# Altium PCB EXPLORER_V3.4.PcbDoc (part 4 of 4)
Units mm, origin at the board's own origin, x right, y up, seen from the top; angles counter-clockwise.
Board outline 160 x 121.01 mm, 2 copper layers (Top Layer, Bottom Layer); 254 components, 245 nets, 1181 pads, 772 vias.
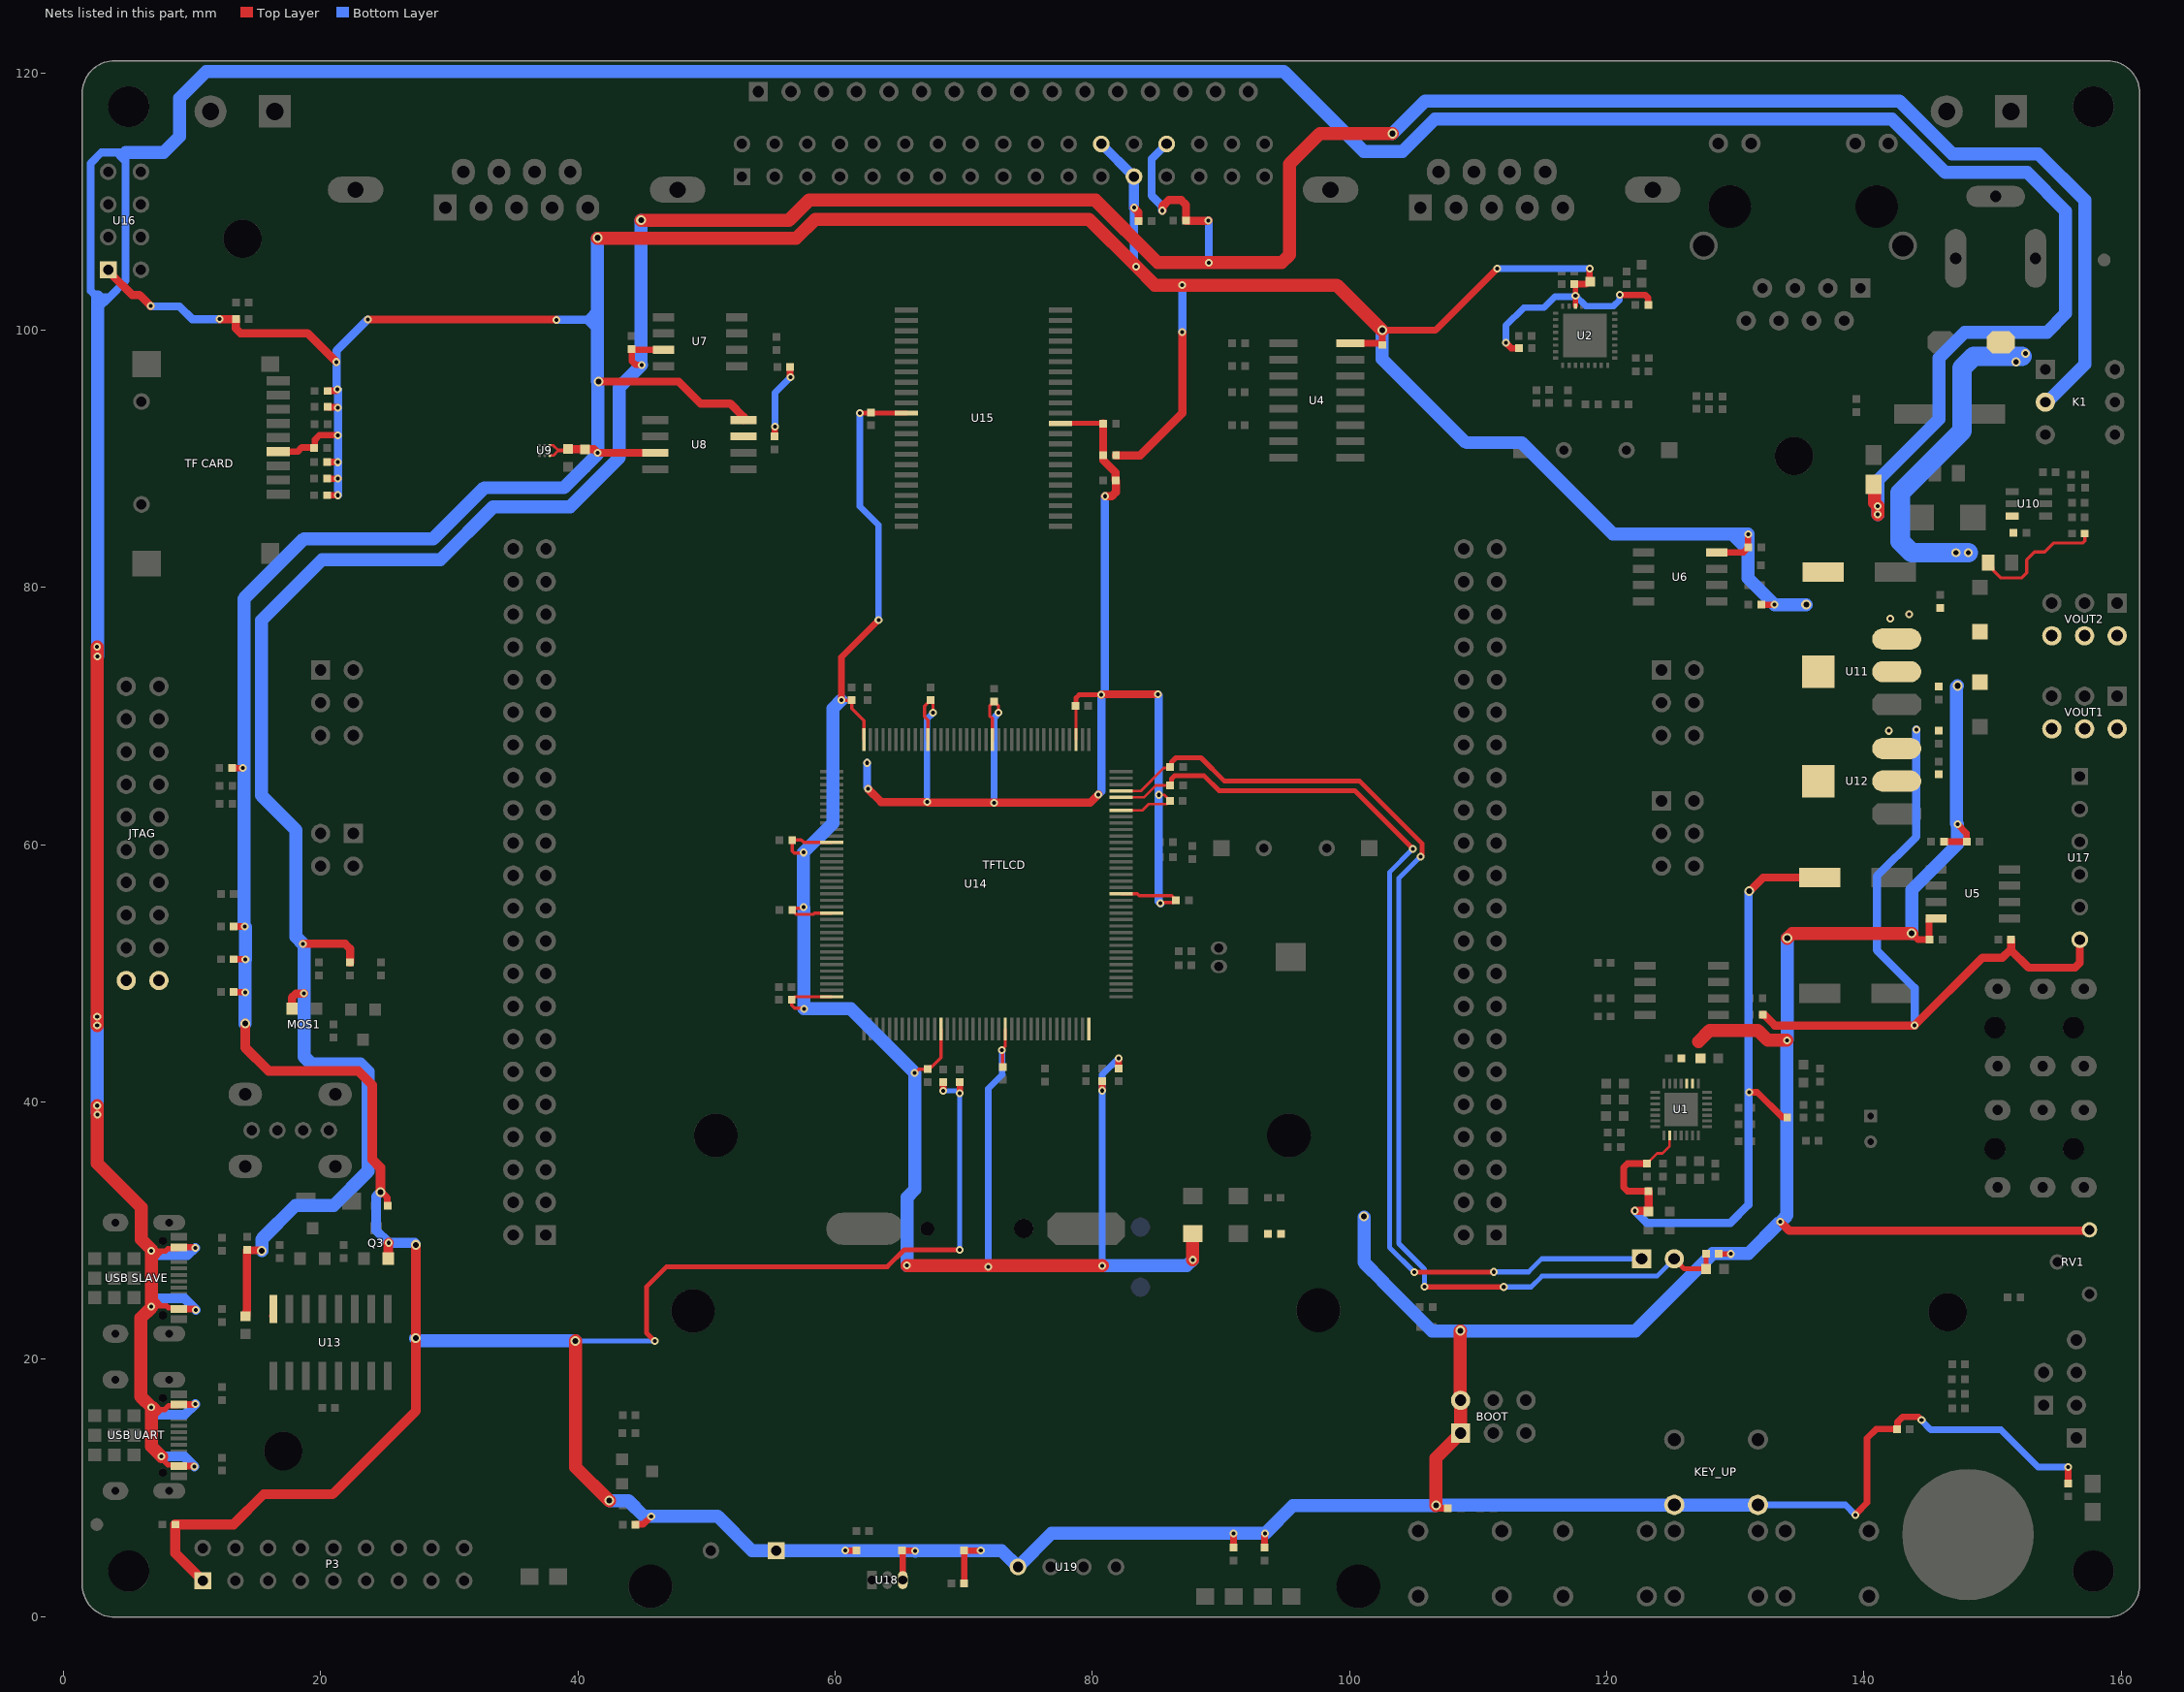
[diagram p4: the nets of this part, all layers, seen from the top]

## Via types
v1: diameter 0.61, hole 0.305, Top Layer to Bottom Layer, tented both sides, 732 vias
v2: diameter 0.762, hole 0.457, Top Layer to Bottom Layer, tented both sides, 23 vias
v3: diameter 0.6, hole 0.3, Top Layer to Bottom Layer, 12 vias
v4: diameter 0.7, hole 0.4, Top Layer to Bottom Layer, tented both sides, 5 vias

## Nets (pads, with @x,y where several pads share a name; then routed paths per layer and width w, separated by ;. In a path a pad name is that pad's centre, name@x,y a point inside that pad or via, vN(x,y) a via of type N, cw(c..) or ccw(c..) an arc to the next point about the centre after c; other vN are vias at no path point) (continued)
VCC3.3: "TF CARD.4" BEEP.1 BOOT.1 BOOT.2 C1.2 C2.2 C9.2 C36.1 C37.1 C42.2 C43.2 C44.2 C46.1 C47.2 C48.2 C53.2 C57.1 C90.1 C92.2 C94.1 C95.1 D3.2 JTAG.1 JTAG.2 KEY_UP.1 L1.1 P3.1 Q3.1 R4.2 R10.2 R19.2 R20.2 R21.1 R22.1 R23.1 R25.2 R26.1 R27.2 R29.1 R31.1 R35.2 R47.1 R51.2 R53.2 R56.1 R57.1 R59.2 R60.2 R61.2 R62.2 R67.2 R68.2 R69.2 R71.1 R75.2 R76.2 R77.2 RV1.3 TFTLCD.24 TFTLCD.25 U1.2 U1.3 U2.14 U4.16 U5.8 U6.8 U8.3 U8.7 U8.8 U9.A1 U9.C1 U11.2 U11.4 U16.2 U18.3 U19.1 VOUT1.2 VOUT1.4 VOUT1.6 | length 803.9
  Top Layer w0.203: U9.A1@37.814,90.253 38.081,90.253 38.481,90.653 38.081,91.053 U9.C1@37.814,91.053
  Top Layer w0.305: 38.481,90.653 39.105,90.653 C47.2@39.219,90.767
  Top Layer w0.381: v1(45.974,21.412) 45.326,22.06 45.326,25.632 46.898,27.203 64.059,27.203 65.38,28.524 v1(69.698,28.524) ; C9.2@117.475,103.581 117.566,103.49 v1(117.566,102.692) U2.14@117.566,101.882
  Top Layer w0.406: R53.2@128.711,28.194 v1(129.642,28.194)
  Top Layer w0.508: R62.2@13.116,65.964 v1(13.945,65.964) ; R59.2@13.243,48.565 13.268,48.539 v1(14.122,48.539) ; R60.2@13.243,51.105 14.122,51.105 v1(14.148,51.079) ; R61.2@13.243,53.645 v1(14.097,53.645) ; 16.688,90.558 18.194,90.558 18.517,90.881 19.452,90.881 C44.2@19.452,90.902 ; C44.2@19.498,90.856 19.544,90.902 19.544,91.498 19.892,91.846 21.283,91.846 21.309,91.821 v1(21.336,91.821) ; R21.1@20.498,87.173 v1(21.336,87.173) ; R22.1@20.498,88.464 21.383,88.464 21.378,88.468 v1(21.336,88.468) ; R23.1@20.498,89.755 21.292,89.755 21.311,89.736 21.313,89.738 v1(21.336,89.738) ; R29.1@20.523,94.056 20.569,94.01 21.306,94.01 v1(21.336,93.98) ; R31.1@20.523,95.275 20.547,95.299 21.205,95.299 v1(21.308,95.402) ; v2(24.636,32.995) 24.685,32.946 24.801,32.946 25.177,32.57 25.177,31.947 R47.1@25.197,31.928 ; R76.2@44.485,7.137 44.531,7.183 45.08,7.183 v1(45.695,7.798) ; C46.1@55.296,91.745 55.296,92.481 v1(55.321,92.507) ; R35.2@56.499,97.13 56.499,96.358 v1(56.515,96.342) ; v1(60.782,5.131) R71.1@61.646,5.131 ; U18.3@65.259,2.845 65.259,5.074 C94.1@65.202,5.131 66.165,5.131 66.19,5.105 v1(66.218,5.105) ; v1(68.402,40.869) R19.2@68.402,41.545 ; v1(69.698,40.691) R20.2@69.698,41.545 ; R75.2@70.037,2.591 70.037,5.121 C95.1@70.028,5.131 v1(71.323,5.131) ; R67.2@90.983,5.369 v1(90.983,6.477) ; R68.2@93.396,5.369 93.396,6.426 v1(93.421,6.452) ; U4.16@100.06,98.984 102.413,98.984 C37.1@102.54,98.857 v2@102.54,99.974 ; v2(102.54,100) 106.68,100 v1(111.481,104.8) ; v2@106.718,8.623 106.909,8.433 R51.2@107.636,8.433 ; v1(112.166,99.035) 112.166,99.016 112.579,98.603 R10.2@113.173,98.603 ; C9.2@117.475,103.581 118.415,103.581 L1.1@118.669,103.835 ; v1(118.669,104.8) L1.1@118.669,103.835 ; L1.1@118.72,103.784 L1.1@118.669,103.835 ; v1(121.006,102.743) 122.987,102.743 123.225,102.505 R4.2@123.225,101.981 ; U6.8@128.56,82.728 130.623,82.728 C43.2@131.004,83.109 130.988,83.125 v1(130.988,84.15) ; R26.1@132.004,78.664 v1(133.045,78.664) ; v1(139.344,7.899) 139.344,7.927 139.395,7.978 139.395,8.018 140.233,8.856 140.233,13.868 140.945,14.58 R77.2@142.561,14.58 142.607,14.626 142.607,15.124 143.002,15.519 144.247,15.519 ; v2@143.713,53.111 144.196,52.629 C42.2@145.101,52.629 145.059,52.67 145.059,54.216 145.123,54.28 U5.8@145.608,54.28 ; R27.2@146.212,60.249 R25.2@147.996,60.249 147.975,60.27 147.975,60.889 v1(147.269,61.595) ; R69.2@155.88,10.347 v1(155.88,11.633)
  Top Layer w0.635: U16.2@3.48,104.699 3.762,104.416 3.762,104.315 5.334,102.743 5.906,102.743 v1(6.769,101.879) ; v1(12.131,100.863) C92.2@13.402,100.863 13.383,100.845 13.383,100.143 13.755,99.771 18.974,99.771 v1(21.209,97.536) ; v1(23.673,100.838) 38.303,100.838 v1(38.329,100.813) ; C47.2@39.219,90.767 39.245,90.742 C48.2@40.54,90.742 41.262,90.742 v1(41.529,90.475) 41.531,90.473 U8.3@46.025,90.473 ; v2(41.605,96.012) 47.828,96.012 49.53,94.31 51.841,94.31 52.883,93.269 U8.8@52.883,93.015 ; R57.1@81.839,90.272 83.718,90.272 86.989,93.542 v1(86.989,99.847) ; v1(83.236,109.525) 83.591,109.169 C90.1@83.591,108.483 ; v1(133.502,30.683) 134.188,29.997 157.458,29.997 RV1.3@157.531,30.07
  Top Layer w0.762: P3.1@10.829,2.788 8.687,4.93 C36.1@8.687,7.163 13.208,7.163 15.57,9.525 20.93,9.525 27.407,16.002 v2@27.407,28.88 ; v2(14.122,46.101) 14.122,44.247 15.951,42.418 22.911,42.418 24.003,41.326 24.003,35.535 24.636,34.901 v2(24.636,32.995) ; Q3.1@25.258,27.832 25.258,29.042 v1(25.273,29.058)
  Top Layer w1.016: v2(39.802,21.438) 39.827,21.412 39.827,11.608 v2@42.443,8.992 ; v2@41.529,107.163 41.554,107.137 56.972,107.137 58.471,108.636 79.731,108.636 v1(83.414,104.953) 84.857,103.51 v1(86.994,103.51) 99.004,103.51 102.514,100 v2(102.54,100) ; v2@106.718,8.623 v2(106.718,8.649) 106.718,12.332 108.636,14.249 BOOT.1@108.636,14.275 BOOT.2@108.636,16.815 108.61,16.84 108.61,22.2 v2@108.629,22.219 ; 127.127,44.704 127.991,45.568 131.75,45.568 132.512,44.806 v1(134.01,44.806) ; v2@134.036,52.73 134.417,53.111 v2@143.713,53.111
  Bottom Layer w0.381: v2@39.702,21.549 39.69,21.549 v2(39.802,21.438) ; v2@39.862,21.412 v1(45.974,21.412) ; v1(68.402,40.869) 69.458,40.869 69.636,40.691 v1(69.698,40.691) v1(69.698,28.524)
  Bottom Layer w0.508: v1(55.321,92.507) 55.321,95.148 v1(56.515,96.342) ; v1(111.481,104.8) v1(118.669,104.8) ; v1(112.166,99.035) 112.166,100.381 113.538,101.752 115.113,101.752 115.959,102.598 117.566,102.598 v1(117.566,102.692) 118.379,101.879 120.523,101.879 121.006,102.362 v1(121.006,102.743) ; KEY_UP.1@131.75,8.687 138.557,8.687 v1(139.344,7.899) ; v1(144.475,15.291) 144.475,15.24 145.186,14.529 150.647,14.529 153.543,11.633 v1(155.88,11.633)
  Bottom Layer w0.635: v1(6.769,101.879) 6.795,101.854 9.017,101.854 10.008,100.863 v1(12.131,100.863) ; v1(21.336,87.173) v1(21.336,88.468) v1(21.336,89.738) 21.336,91.796 21.311,91.821 v1(21.336,91.821) v1(21.336,93.98) 21.336,95.373 v1(21.308,95.402) 21.234,95.475 21.234,98.425 23.647,100.838 v1(23.673,100.838) ; v1(38.329,100.813) 40.691,100.813 ; 41.504,100.736 41.427,100.813 40.691,100.813 ; 41.529,99.974 40.691,100.813 ; 41.529,101.651 40.691,100.813 ; v1(83.236,109.525) 83.236,105.131 v1(83.414,104.953) ; v1(86.989,99.847) 86.989,103.505 v1(86.994,103.51)
  Bottom Layer w0.762: v2(24.636,32.995) 24.308,32.666 24.308,30.023 v1(25.273,29.058) 27.305,29.058 27.407,28.956 v2(27.407,28.905) v2@27.407,28.88 ; TFTLCD.24@80.694,114.484 TFTLCD.25@83.234,111.944 83.234,109.527 v1(83.236,109.525)
  Bottom Layer w1.016: v2(14.122,46.101) v1(14.122,48.539) 14.122,51.054 v1(14.148,51.079) 14.148,53.594 v1(14.097,53.645) 14.021,53.721 14.021,65.888 v1(13.945,65.964) 14.021,66.04 14.021,79.121 18.694,83.795 28.753,83.795 32.715,87.757 38.913,87.757 41.529,90.373 v1(41.529,90.475) 41.554,90.5 v2@41.554,95.936 ; v2(27.381,21.641) 27.584,21.438 v2(39.802,21.438) ; v2@41.529,96.012 41.529,99.974 41.529,100.711 41.504,100.736 41.529,100.762 41.529,101.651 v2@41.529,107.163 ; v2@42.443,8.992 43.942,8.992 45.136,7.798 v1(45.695,7.798) 50.876,7.798 53.543,5.131 BEEP.1@55.423,5.131 v1(60.782,5.131) 66.192,5.131 v1(66.218,5.105) 66.243,5.131 v1(71.323,5.131) 72.949,5.131 U19.1@74.219,3.861 76.835,6.477 v1(90.983,6.477) 93.396,6.477 v1(93.421,6.452) 95.606,8.636 106.705,8.636 v2@106.718,8.623 ; v2@101.117,31.039 101.117,27.534 102.616,26.035 102.616,26 106.416,22.2 108.585,22.2 108.604,22.219 108.629,22.219 108.649,22.2 122.225,22.2 128.245,28.219 131.013,28.219 v1@133.452,30.658 ; v2(102.54,100) 102.54,97.765 108.941,91.364 ; v2@106.655,8.687 KEY_UP.1@125.25,8.687 KEY_UP.1@131.75,8.687 ; 109.129,91.262 113.386,91.262 120.472,84.176 129.743,84.176 ; v1(133.502,30.683) 134.01,31.191 v1(134.01,44.806) 134.036,44.831 v2@134.036,52.73 ; v2(135.509,78.664) v1(133.045,78.664) 130.988,80.721 130.988,82.931 ; v2@143.713,53.111 v2(143.713,53.137) 143.713,56.49 147.269,60.046 v1(147.269,61.595) 147.193,61.671 147.193,72.288 v2(147.269,72.365) ; 129.743,84.176 130.988,84.176 v1(130.988,84.15) 130.988,82.931 ; 129.743,84.176 130.988,82.931
  other v2: 42.443,9.017 108.62,22.235 101.117,31.115 134.036,52.756 41.529,107.188
VCC3.3A: C5.2 C6.2 C59.2 C61.1 R2.1 R3.1 U1.16 U12.2 U12.4 | length 55.4
  Top Layer w0.203: C5.2@123.114,35.214 123.917,36.017 124.333,36.017 124.881,36.565 U1.16@124.881,37.396
  Top Layer w0.508: C5.2@123.114,35.214 121.608,35.214 121.31,34.916 121.31,33.368 121.608,33.071 R2.1@123.241,33.071 ; v1(131.064,40.767) 131.699,40.767 133.634,38.832 133.99,38.832 R3.1@134.036,38.786
  Top Layer w0.635: v1(122.174,31.547) 123.179,31.547 C6.2@123.242,31.483 123.242,33.069 R2.1@123.241,33.071 ; v2@131.064,56.363 132.156,57.455 C61.1@136.576,57.455
  Bottom Layer w0.635: v1(122.174,31.547) 123.114,30.607 129.616,30.607 131.013,32.004 131.013,40.716 v1(131.064,40.767) 131.013,40.818 131.013,56.312 v2@131.064,56.363
  other v2: 131.064,56.388
VCC3.3M: C76.2 C77.2 C78.2 C79.2 C80.2 C81.2 C82.2 C83.2 C84.2 C85.2 C86.2 C87.2 C88.2 C89.2 D4.1 R55.2 R56.2 R57.2 R58.2 U14.17 U14.30 U14.39 U14.52 U14.62 U14.72 U14.84 U14.95 U14.108 U14.121 U14.131 U14.144 U15.11 U15.33 | length 278.9
  Top Layer w0.203: C77.2@78.68,70.815 78.729,70.766 U14.39@78.729,68.183 ; U14.30@82.229,62.683 83.912,62.683 84.399,63.17 85.776,63.17 C82.2@86.03,63.424 85.573,63.881 v1(85.166,63.881)
  Top Layer w0.254: v1(57.534,55.147) 57.461,55.074 56.82,55.074 C76.2@56.661,54.915 56.986,54.59 58.298,54.59 58.392,54.683 U14.95@59.729,54.683 ; v1(57.546,59.4) 57.506,59.36 56.81,59.36 56.661,59.509 C78.2@56.661,60.376 57.363,60.376 57.555,60.183 U14.84@59.729,60.183 ; v1(57.582,47.244) 57.514,47.312 56.853,47.312 56.626,47.539 C86.2@56.626,47.955 56.854,48.183 U14.108@59.729,48.183 ; v1@60.487,71.238 C79.2@61.29,71.238 61.29,70.587 62.229,69.648 U14.72@62.229,68.183 ; v1(66.192,42.266) 66.481,42.554 C85.2@67.183,42.554 67.356,42.727 67.518,42.727 68.229,43.439 U14.121@68.229,45.683 ; U14.62@67.229,68.183 67.229,69.693 66.954,69.968 66.954,70.78 C80.2@67.412,71.238 67.585,71.065 67.585,70.946 67.615,70.916 v1(67.615,70.256) ; U14.52@72.229,68.183 72.229,69.824 72.016,70.037 72.016,70.788 C81.2@72.365,71.136 72.695,70.806 v1(72.695,70.256) ; v1(72.974,44.044) 72.974,44.116 73.229,44.37 U14.131@73.229,45.683 ; C87.2@73.025,42.732 v1@73.025,44.044 ; U14.17@82.229,56.183 83.501,56.183 83.652,56.032 86.181,56.032 86.33,55.884 86.33,55.85 86.452,55.728 C83.2@86.554,55.728 ; v1(85.293,55.448) 85.349,55.504 86.33,55.504 C83.2@86.503,55.677
  Top Layer w0.381: v1(61.925,93.574) 62.722,93.574 62.773,93.624 C88.2@62.789,93.608 62.838,93.559 U15.33@65.53,93.559 ; U15.11@77.53,92.759 C89.2@80.839,92.759 ; C77.2@78.68,70.815 78.741,70.876 78.741,71.43 78.964,71.653 v1(80.696,71.653)
  Top Layer w0.508: v1@60.487,71.238 60.487,74.584 v1(63.373,77.47) ; v1(80.772,40.894) R55.2@80.772,41.621 ; C84.2@82.042,42.621 v1(82.042,43.409)
  Top Layer w0.635: v1(62.56,64.338) 63.574,63.324 v1(67.164,63.324) 67.216,63.271 v1(72.365,63.271) 79.832,63.271 v1(80.467,63.906) ; v1(80.696,71.653) 80.747,71.704 v1(85.09,71.704) ; C89.2@80.839,92.759 C89.2@80.839,92.735 R57.2@80.839,90.272 80.839,89.9 81.788,88.951 81.788,88.351 R58.2@81.823,88.316 81.823,87.411 81.509,87.097 v1(80.975,87.097)
  Top Layer w1.016: v1(65.583,27.305) 65.608,27.28 v1(80.772,27.28) ; v1(87.808,27.737) D4.1@87.808,29.769
  Bottom Layer w0.508: v1(61.925,93.574) 61.925,86.309 63.373,84.861 v1(63.373,77.47) ; v1(67.164,63.324) 67.144,63.344 67.144,63.481 67.132,63.493 67.132,69.765 67.615,70.248 v1(67.615,70.256) ; v1(71.907,27.203) 71.907,41.046 73,42.139 72.974,42.164 v1(72.974,44.044) ; v1(72.365,63.271) 72.365,69.848 72.492,69.975 72.466,70 72.695,70.229 v1(72.695,70.256) ; v1(80.772,27.28) v1(80.772,40.894) 80.772,42.139 v1(82.042,43.409)
  Bottom Layer w0.635: v1(62.484,66.37) 62.484,64.465 62.586,64.364 v1(62.56,64.338) ; v1(80.467,63.906) 80.696,64.135 v1(80.696,71.653) ; v1@80.721,71.653 80.975,71.907 v1(80.975,87.097) ; v1(85.09,71.704) 85.166,71.628 v1(85.166,63.881) 85.166,55.575 v1(85.293,55.448)
  Bottom Layer w1.016: v1@57.531,55.143 57.539,55.151 57.539,59.393 59.817,61.671 59.817,70.587 v1(60.477,71.247) ; v1(57.534,55.147) 57.582,55.099 v1(57.582,47.244) 61.214,47.244 v1(66.192,42.266) 66.192,33.198 65.583,32.588 v1(65.583,27.305) ; v1(80.772,27.28) 87.351,27.28 v1(87.808,27.737)
VCC5: C45.1 C54.2 C60.2 C62.2 C63.2 C91.2 C93.1 D2.2 K1.2 MOS1.2 R13.1 R39.1 TFTLCD.28 U7.3 U11.3 U12.3 U13.16 U17.6 VOUT2.2 VOUT2.4 VOUT2.6 | length 345.2
  Top Layer w0.508: v1(44.958,97.307) 44.948,97.317 44.481,97.317 44.183,97.615 C45.1@44.183,98.539 44.247,98.476 U7.3@46.66,98.476
  Top Layer w0.635: C63.2@14.149,23.355 14.213,23.419 14.213,23.729 14.275,23.791 14.275,28.473 15.392,28.473 v2(15.418,28.448) ; U13.16@16.289,23.355 U13.16@16.307,23.373 ; MOS1.2@17.77,47.275 17.77,48.133 18.075,48.438 v1(18.694,48.438) v1@18.694,48.474 ; v1(18.618,52.299) 21.904,52.299 22.276,51.927 R39.1@22.276,50.851 ; v1(85.446,109.296) 85.458,109.309 85.458,109.638 85.942,110.122 86.912,110.122 87.284,109.75 C91.2@87.284,108.509 89.002,108.509 v1(89.027,108.534) ; R13.1@132.131,46.787 132.232,46.787 133.071,45.949 v1(143.942,45.949) 149.212,51.219 150.762,51.219 151.397,51.854 ; C93.1@151.435,52.629 151.435,51.943 151.46,51.918 151.397,51.854 ; U17.6@156.78,52.618 156.78,50.816 156.408,50.444 152.806,50.444 151.397,51.854
  Top Layer w1.016: v2(44.907,108.56) 56.413,108.56 57.963,110.109 80.239,110.109 85.09,105.258 v1(89.052,105.258) 94.731,105.258 95.326,105.853 95.326,112.928 97.688,115.29 v2(103.337,115.29)
  Bottom Layer w0.635: v1(85.446,109.296) 85.433,109.309 85.433,109.638 84.607,110.464 84.607,113.317 TFTLCD.28@85.774,114.484 ; v1(89.027,108.534) 89.052,108.509 v1(89.052,105.258) ; v1(143.942,45.949) 143.942,48.87 140.995,51.816 140.995,57.556 144.069,60.63 v1(144.069,68.961)
  Bottom Layer w1.016: v2(15.418,28.448) 15.418,29.337 18.034,31.953 21.006,31.953 23.673,34.62 23.673,42.356 23.078,42.951 19.29,42.951 18.694,43.547 v1(18.694,48.438) 18.694,52.222 v1(18.618,52.299) 18.085,52.832 18.085,61.138 15.392,63.83 15.392,77.445 20.117,82.169 29.312,82.169 33.426,86.284 39.395,86.284 43.205,90.094 43.205,95.555 v1(44.958,97.307) 44.907,97.358 v2(44.907,108.56) ; v2(103.337,115.29) 105.877,117.831 142.748,117.831 146.863,113.716 153.568,113.716 157.175,110.109 157.175,97.358 154.229,94.412 K1.2@154.102,94.412
  other v1: 141.935,68.859 142.037,77.597 143.51,77.927
VDDA: C71.2 C72.2 P6.2 R53.1 U14.33 | length 88
  Top Layer w0.203: U14.33@82.229,64.183 83.767,64.183 85.56,65.977 85.957,65.977 C72.2@86.155,66.175
  Top Layer w0.381: C72.2@86.155,66.175 86.155,66.42 86.495,66.759 88.46,66.759 90.272,64.948 100.787,64.948 105.626,60.109 105.626,59.195 v1(105.512,59.08) ; v1(105.833,25.635) 105.852,25.654 105.877,25.629 v1(111.989,25.629) ; P6.2@125.55,27.813 P6.2@125.247,27.813 126.033,27.027 C71.2@127.724,27.027 127.711,27.04 R53.1@127.711,28.194
  Bottom Layer w0.381: v1(105.512,59.08) 103.835,57.404 103.835,29.007 105.833,27.009 v1(105.833,25.635) ; v1(111.989,25.629) 114.122,25.629 114.96,26.467 117.958,26.467 123.901,26.467 P6.2@125.247,27.813
VM: C56.2 C58.2 R42.2 U10.3 VD1.2 | length 36.6
  Top Layer w0.254: C58.2@149.657,81.939 150.03,81.566 150.03,81.364 150.647,80.747 152.248,80.747 152.654,81.153 152.654,82.144 153.268,82.757 154.051,82.757 154.758,83.464 157.022,83.464 157.171,83.613 R42.2@157.171,84.196
  Bottom Layer w1.524: v4(148.107,82.702) v4(147.142,82.702) 143.717,82.702 142.824,83.595 142.824,87.376 147.625,92.177 147.625,97.075 148.518,97.968 152.273,97.968
  other v4: 151.816,97.536 152.552,98.196
VREF+: C66.2 P6.1 U14.32 | length 78.6
  Top Layer w0.203: U14.32@82.229,63.683 84.003,63.683 84.938,64.618 C66.2@86.046,64.618
  Top Layer w0.381: C66.2@86.046,64.618 86.155,64.727 86.155,65.135 86.378,65.358 88.693,65.358 89.84,64.211 100.406,64.211 v1(104.927,59.69) ; v1(105.029,26.772) 111.176,26.772 v1(111.201,26.797)
  Bottom Layer w0.381: v1(104.927,59.69) 103.099,57.861 103.099,28.702 v1(105.029,26.772) ; v1(111.201,26.797) 113.919,26.797 114.935,27.813 118.77,27.813 P6.1@122.707,27.813
VUSB: "USB SLAVE.2" "USB SLAVE.11" "USB UART.2" "USB UART.11" F1.1 | length 352.8
  Top Layer w0.406: 6.629,24.79 6.833,24.689 7.087,24.689 7.62,24.155 ; v3(6.833,16.281) 7.074,16.523 7.544,16.053 7.112,15.621 6.909,15.621 ; v3(6.833,28.423) 7.645,28.423 ; 6.96,27.737 7.645,28.423 ; 7.132,16.104 7.883,16.104 8.179,16.4 8.868,16.4 8.965,16.497 ; 7.163,24.155 7.62,24.155 ; v3(7.62,12.446) 7.657,12.409 7.657,12.268 8.132,11.794 8.868,11.794 8.965,11.697 ; 8.965,23.914 8.868,24.011 8.145,24.011 8.001,24.155 7.62,24.155 ; 8.965,28.714 8.868,28.618 8.132,28.618 7.937,28.423 7.645,28.423
  Top Layer w0.508: 8.965,11.697 10.147,11.697 v3(10.185,11.659) ; 8.965,16.497 10.223,16.497 v3(10.236,16.51) ; 8.965,23.914 10.223,23.914 v3(10.287,23.851) ; 8.965,28.714 10.198,28.714 v3(10.236,28.677)
  Top Layer w1.016: v1(2.616,39.726) 2.616,35.23 6.045,31.801 6.045,29.312 6.833,28.524 v3(6.833,28.423) 6.833,24.689 6.833,24.028 6.02,23.216 6.02,17.094 v3(6.833,16.281) 6.833,13.233 v3(7.62,12.446) ; v1(2.616,45.949) v1(2.616,46.634) v3(2.616,75.387) ; F1.1@140.743,88.011 140.829,87.925 140.829,86.577 v3(141.072,86.335) v1(141.072,85.68)
  Bottom Layer w0.61: 2.565,102.616 2.108,103.073 2.108,112.979 2.946,113.817 4.14,113.817 ; 2.603,102.578 2.642,102.578 3.569,102.578 ; 2.642,101.651 3.569,102.578 ; 3.569,102.578 4.826,103.835 4.826,113.132 ; 4.14,113.817 4.483,113.474 4.826,113.132 ; 4.14,113.817 4.826,113.817 4.826,113.132
  Bottom Layer w0.762: v3(6.807,24.105) 7.442,24.74 9.398,24.74 v3(10.287,23.851) ; v3(6.833,16.281) 7.417,15.697 9.423,15.697 v3(10.236,16.51) ; v3(6.833,28.423) 7.163,28.092 9.652,28.092 v3(10.236,28.677) ; v3(7.62,12.446) 9.398,12.446 v3(10.185,11.659)
  Bottom Layer w1.016: v1@2.616,39.167 v1(2.616,39.726) v1(2.616,45.949) v1(2.616,46.634) ; v1(2.642,74.651) 2.642,75.387 2.642,101.651 2.642,102.578 ; 4.826,113.817 7.772,113.817 9.017,115.062 9.017,118.034 11.1,120.117 94.894,120.117 101.112,113.899 104.12,113.899 106.629,116.408 142.164,116.408 146.304,112.268 152.679,112.268 155.677,109.271 155.677,101.295 154.229,99.847 147.828,99.847 145.821,97.841 145.821,93.091 141.072,88.341 v3@141.072,86.493 ; v1(141.072,85.68) v3(141.072,86.335)
  other v1: 2.642,39.04
pads on no net: "TF CARD.0" "TF CARD.9" "USB SLAVE.3" "USB SLAVE.9" "USB SLAVE." "USB UART.3" "USB UART.9" "USB UART." BAT.0 COM2.0 COM2.1 COM2.4 COM2.6 COM2.7 COM2.8 COM2.9 COM3.0 COM3.2 COM3.5 COM3.6 COM3.7 COM3.8 COM3.9 EARTHNET. EARTHNET.7 JTAG.11 JTAG.17 JTAG.19 K1.1 K1.4 K1.5 K1.6 LINE_IN.0 PHONE.0 TFTLCD. TFTLCD.32 U1.9 U1.25 U2.11 U2.12 U2.13 U2.18 U2.19 U2.27 U2.28 U9.A3 U9.C2 U13.7 U13.8 U13.9 U13.10 U13.11 U13.12 U13.15 Y1. Y2. Y3.

## Polygon pours and split planes (outlines as drawn)
GND on Top Layer "Top Layer-No Net" (solid, remove dead copper, pour order 58): 3.632,120.929 160.007,120.929 161.417,119.52 161.417,1.422 159.969,-0.025 2.87,-0.025 1.448,1.397 1.448,120.98
GND on Top Layer "Top Layer-No Net" (solid, pour order 49): 16.307,68.529 25.375,68.529 25.933,67.97 25.933,64.516 23.673,62.255 19.609,62.255 18.72,61.366 18.72,57.836 19.279,57.277 24.486,57.277 25.349,56.413 25.349,55.423 24.714,54.788 18.263,54.788 16.764,56.286 16.764,63.779 16.307,64.237
AGND on Top Layer "Top Layer-No Net" (solid, pour order 39): 137.973,43.815 136.982,44.806 131.267,44.806 128.27,42.342 128.27,41.25 128.524,40.996 129.286,40.996 130.632,42.342 137.973,42.342
GND on Top Layer "NONET_L-01_P-001" (solid, remove dead copper, pour order 56): 151.282,94.971 151.765,94.488 151.765,90.526 153.391,88.9 153.391,83.21 152.248,82.067 151.968,82.067 151.714,82.321 151.714,83.007 152.324,83.617 152.324,86.919 152.146,87.097 150.774,87.097 150.216,87.655 147.447,87.655 146.558,88.544 146.558,94.59 146.939,94.971
VM on Top Layer "NONET_L-01_P-001" (solid, remove dead copper, pour order 57): 149.962,100.051 151.79,100.051 152.908,98.933 152.908,98.12 151.968,97.18 150.927,97.18 149.504,98.603 149.504,99.593
NetDC_IN1_1 on Top Layer "Top Layer-No Net" (solid, pour order 0): 145.974,107.874 147.498,107.874 148.006,107.366 148.006,98.095 146.863,96.952 144.831,96.952 143.916,97.866 143.916,104.038 145.466,105.588 145.466,107.239
VM on Top Layer "NONET_L-01_P-001" (solid, remove dead copper, pour order 55): 151.003,85.801 150.571,85.369 150.571,85.115 148.92,83.464 147.193,83.464 146.761,83.033 146.761,81.585 147.245,81.101 150.03,81.101 150.266,81.338 150.266,82.652 150.698,83.083 151.46,83.083 152.019,83.642 152.019,85.7 151.917,85.801
NetC50_2 on Top Layer "NONET_L-01_P-001" (solid, remove dead copper, pour order 54): 150.647,86.817 150.089,87.376 147.117,87.376 146.812,87.071 146.812,84.404 147.142,84.074 148.869,84.074 150.927,86.131 151.892,86.131 152.019,86.258 152.019,86.741 151.943,86.817
VBTN on Top Layer "NONET_L-01_P-001" (solid, remove dead copper, pour order 51): 145.999,95.529 142.926,95.529 140.081,92.685 140.081,90.348 140.868,89.56 141.605,89.56 142.189,88.976 142.189,85.395 143.332,84.252 145.872,84.252 146.253,84.633 146.253,95.275
VCC3.3 on Top Layer "Top Layer-No Net" (solid, pour order 33): 126.797,41.072 126.111,41.072 126.111,42.037 125.527,42.621 125.527,44.552 126.136,45.161 127.432,45.161 127.686,44.907 127.686,43.028 126.797,43.028
VCC3.3M on Top Layer "Top Layer-No Net" (solid, pour order 24): 79.604,46.558 79.604,43.764 80.353,43.015 82.156,43.015 82.423,43.282 82.423,44.272 82.093,44.602 80.467,44.602 80.061,45.009 80.061,46.558
VCC5 on Top Layer "Top Layer-No Net" (solid, pour order 8): 141.223,75.133 159.969,75.133 160.528,75.692 160.528,76.81 159.918,77.419 150.571,77.419 149.327,78.664 140.767,78.664 140.106,78.003 140.106,76.143
VCC3.3 on Top Layer "VCC3.3_L01_P041" (solid, pour order 41): 94.361,29.464 96.241,29.464 96.596,29.82 101.067,29.82 101.625,30.378 101.625,31.521 101.346,31.801 94.742,31.801 94.361,31.42
VCC3.3M on Top Layer "Top Layer-No Net" (solid, pour order 37): 93.955,30.074 93.955,27.381 92.456,25.883 87.909,25.883 86.106,27.686 86.106,30.15 86.385,30.429 88.113,30.429 88.494,30.048 88.494,29.185 89.129,28.55 92.761,28.55 93.091,28.88 93.091,30.074
VCC5 on Top Layer "Top Layer-No Net" (solid, pour order 34): 14.021,28.169 14.021,23.216 14.275,22.962 16.459,22.962 16.612,23.114 16.612,25.273 15.926,25.959 15.926,28.143 15.9,28.169
VCC3.3 on Top Layer "Top Layer-No Net" (solid, pour order 29): 4.369,50.14 8.204,50.14 11.836,46.507 14.503,46.507 14.91,46.101 14.91,43.891 5.131,43.891 3.277,45.745 3.277,49.128
VCC3.3M on Top Layer "Top Layer-No Net" (solid, pour order 28): 61.595,71.526 61.595,70.434 62.916,69.113 62.916,66.091 61.112,66.091 59.944,67.259 59.944,71.171 60.316,71.542
VCC3.3 on Top Layer "Top Layer-No Net" (solid, pour order 26): 51.892,91.465 55.601,91.465 55.829,91.694 55.829,93.523 55.118,94.234 51.867,94.234
NetC30_1 on Top Layer "Top Layer-No Net" (solid, pour order 20): 127.864,48.362 127.864,47.777 127.965,47.676 129.565,47.676 130.734,46.507 131.343,46.507 131.42,46.584 131.42,48.514 131.699,48.793 133.604,48.793 134.722,47.676 138.252,47.676 138.278,47.701 138.278,49.225 137.135,50.368 131.47,50.368 130.404,49.301 129.464,48.362
VCC3.3A on Top Layer "Top Layer-No Net" (solid, pour order 19): 139.243,62.967 139.243,56.439 138.557,55.753 135.154,55.753 134.722,56.186 134.722,65.913 135.23,66.421 138.989,66.421 139.192,66.218
VCC3.3 on Top Layer "Top Layer-No Net" (solid, pour order 17): 135.636,83.21 138.786,83.21 139.573,82.423 139.573,75.641 136.017,75.641 134.849,74.473 134.849,82.423
VCC5 on Top Layer "Top Layer-No Net" (solid, pour order 16): 146.126,69.266 140.665,69.266 140.132,68.732 140.132,67.208 140.64,66.7 144.018,66.7 144.501,67.183 144.501,67.945 145.11,68.555 146.101,68.555
VCC3.3A on Top Layer "Top Layer-No Net" (solid, pour order 14): 145.999,65.811 140.437,65.811 139.268,66.98 135.788,66.98 135.23,66.421 135.23,63.5 135.763,62.967 139.243,62.967 140.437,64.16 145.974,64.16 146.329,64.516 146.329,65.481
VCC3.3 on Top Layer "Top Layer-No Net" (solid, pour order 12): 144.424,74.32 144.424,72.898 144.196,72.669 140.716,72.669 139.624,71.577 135.331,71.577 134.849,72.06 134.849,74.981 135.509,75.641 139.573,75.641 140.894,74.32
GND on Top Layer "Top Layer-No Net" (solid, pour order 11): 153.295,82.093 159.969,82.093 160.553,81.509 160.553,78.461 160.147,78.054 153.391,78.054 152.781,78.664 152.781,81.636
GND on Top Layer "Top Layer-No Net" (solid, pour order 10): 153.01,74.625 160.274,74.625 160.604,74.295 160.604,70.993 160.426,70.815 154.28,70.815 153.01,72.085
VCC3.3 on Top Layer "Top Layer-No Net" (solid, pour order 9): 141.097,74.524 149.733,74.524 153.873,70.383 159.893,70.383 160.452,69.825 160.452,68.453 159.944,67.945 152.908,67.945 148.92,71.933 145.412,71.933 144.676,72.669 141.097,72.669 140.64,73.127 140.64,74.066
GND on Bottom Layer "Top Layer-No Net" (solid, remove dead copper, pour order 52): 3.327,120.955 160.02,120.955 161.417,119.558 161.417,1.473 159.893,-0.051 2.946,-0.051 1.448,1.448 1.448,120.904 1.473,120.929
VCC5 on Bottom Layer "Top Layer-No Net" (solid, pour order 42): 153.441,94.564 153.441,95.148 153.899,95.606 156.058,95.606 158.572,93.091 158.572,81.458 160.274,79.756 160.274,75.819 159.868,75.413 154.051,75.413 152.552,76.911 152.552,80.797 156.058,84.303 156.058,92.329 154.915,93.472 153.873,93.472 153.416,93.929
VCC5 on Bottom Layer "Top Layer-No Net" (solid, pour order 43): 141.63,78.41 143.967,78.41 144.501,77.876 144.501,68.072 143.789,67.361 141.91,67.361 140.945,68.326 140.945,77.749
AGND on Bottom Layer "Top Layer-No Net" (solid, pour order 40): 129.057,40.919 127.432,39.294 127.432,38.43 127.102,38.1 124.663,38.1 124.536,38.227 124.536,40.945 124.816,41.224 127.381,41.224 127.381,41.3 128.651,42.57 128.88,42.57 129.057,42.393

## Keep-outs
Keep-Out Layer:
  lines w0.203: 158.908,-0.051 ccw(c158.908,2.489) 161.448,2.489 161.448,118.415 ccw(c158.908,118.415) 158.908,120.955 3.988,120.955 ccw(c3.988,118.415) 1.448,118.415 1.448,2.495 ccw(c3.988,2.495) 3.988,-0.045 158.908,-0.045

## Other copper
Top Layer:
  pour cut-out: 154.336,3.531 ccw(c157.836,3.531) 157.836,0.031 ccw(c157.836,3.531) 161.336,3.531 ccw(c157.836,3.531) 157.836,7.031 ccw(c157.836,3.531)
  pour cut-out: 154.336,117.379 ccw(c157.836,117.379) 157.836,113.879 ccw(c157.836,117.379) 161.336,117.379 ccw(c157.836,117.379) 157.836,120.879 ccw(c157.836,117.379)
  pour cut-out: 1.58,117.379 ccw(c5.08,117.379) 5.08,113.879 ccw(c5.08,117.379) 8.58,117.379 ccw(c5.08,117.379) 5.08,120.879 ccw(c5.08,117.379)
  pour cut-out: 1.58,3.531 ccw(c5.08,3.531) 5.08,0.031 ccw(c5.08,3.531) 8.58,3.531 ccw(c5.08,3.531) 5.08,7.031 ccw(c5.08,3.531)
  pour cut-out: 97.887,2.342 ccw(c100.681,2.342) 100.681,-0.452 ccw(c100.681,2.342) 103.475,2.342 ccw(c100.681,2.342) 100.681,5.136 ccw(c100.681,2.342)
  pour cut-out: 42.837,2.342 ccw(c45.631,2.342) 45.631,-0.452 ccw(c45.631,2.342) 48.425,2.342 ccw(c45.631,2.342) 45.631,5.136 ccw(c45.631,2.342)
  pour cut-out: 47.925,37.413 ccw(c50.719,37.413) 50.719,34.619 ccw(c50.719,37.413) 53.513,37.413 ccw(c50.719,37.413) 50.719,40.207 ccw(c50.719,37.413)
  pour cut-out: 92.502,37.413 ccw(c95.296,37.413) 95.296,34.619 ccw(c95.296,37.413) 98.09,37.413 ccw(c95.296,37.413) 95.296,40.207 ccw(c95.296,37.413)
  pour cut-out: 143.712,23.673 ccw(c146.506,23.673) 146.506,20.879 ccw(c146.506,23.673) 149.3,23.673 ccw(c146.506,23.673) 146.506,26.467 ccw(c146.506,23.673)
  pour cut-out: 131.774,90.221 ccw(c134.568,90.221) 134.568,87.427 ccw(c134.568,90.221) 137.362,90.221 ccw(c134.568,90.221) 134.568,93.015 ccw(c134.568,90.221)
  pour cut-out: 11.124,107.112 ccw(c13.918,107.112) 13.918,104.318 ccw(c13.918,107.112) 16.712,107.112 ccw(c14.312,106.718) 13.918,109.118 ccw(c13.524,106.718)
  pour cut-out: 14.299,12.878 ccw(c17.093,12.878) 17.093,10.084 ccw(c17.093,12.878) 19.887,12.878 ccw(c17.093,12.878) 17.093,15.672 ccw(c17.093,12.878)
  pour cut-out: 46.196,23.758 ccw(c48.946,23.758) 48.946,21.008 ccw(c48.946,23.758) 51.696,23.758 ccw(c48.946,23.758) 48.946,26.508 ccw(c48.946,23.758)
  pour cut-out: 94.826,23.818 ccw(c97.576,23.818) 97.576,21.068 ccw(c97.576,23.818) 100.326,23.818 ccw(c97.576,23.818) 97.576,26.568 ccw(c97.576,23.818)
  pour cut-out: 154.864,96.241 154.864,91.821 155.219,91.821 155.245,91.846 155.245,96.241
  pour cut-out: 142.316,85.09 142.316,84.76 137.719,84.76 137.719,85.09
  pour cut-out: 92.532,119.609 92.939,119.202 92.939,111.506 92.227,110.795 58.039,110.795 56.947,111.887 56.947,115.748 54.534,118.161 54.534,119.456 54.762,119.685 63.805,119.685 63.881,119.609
  pour cut-out: 83.573,109.989 83.573,110.522 83.566,110.515 83.287,110.515 83.287,110.149 83.236,110.098 83.359,109.975 83.589,109.975
  pour cut-out: 58.113,110.873 59.524,112.284 59.539,112.269 59.539,111.591 59.013,111.591 58.268,110.846 58.24,110.873
  pour cut-out: 45.598,102.185 45.598,101.371 45.944,101.371 45.944,102.185
  pour cut-out: 12.852,6.082 12.852,6.528 13.206,6.528 13.208,6.526 13.134,6.452 13.134,6.203 12.974,6.203
  pour cut-out: 14.544,51.476 14.554,51.486 14.554,51.892 14.453,51.892 14.321,51.761 14.321,51.612 14.407,51.612
  pour cut-out: 21.565,44.466 21.565,44.12 21.438,44.12 21.412,44.094 21.412,44.501 21.53,44.501
  pour cut-out: 18.474,46.546 18.966,46.546 18.966,46.753 18.999,46.787 18.974,46.812 18.466,46.812 18.466,46.554
  pour cut-out: 7.032,55.463 7.032,56.144 7.347,56.144 7.423,56.068 7.417,56.062 7.417,55.54 7.108,55.54
  pour cut-out: 67.589,46.685 67.696,46.685 67.848,46.837 67.625,47.06 67.586,47.06 67.586,46.784 67.564,46.761
  pour cut-out: 157.646,12.763 157.646,22.415 157.124,22.936 152.959,22.936 152.476,22.454 152.476,12.776
  pour cut-out: 61.844,55.314 61.849,55.309 61.849,54.534 61.697,54.534 61.474,54.756 61.474,55.683 61.817,55.683 61.824,55.677
  pour cut-out: 127.306,120.574 127.306,98.604 136.323,98.604 143.18,98.604 143.306,98.73 143.306,120.574
  pour cut-out: 140.157,13.17 140.157,-1.15 140.03,-1.277 156.286,-1.277 156.286,12.916 156.159,13.043
  pour cut-out: 125.247,30.963 125.285,30.924 125.452,30.924 125.452,30.659 125.451,30.658 125.247,30.658
  pour cut-out: 127.97,33.736 127.737,33.736 127.711,33.761 127.711,33.96 127.746,33.96
  pour cut-out: 146.863,15.045 146.863,14.783 147.041,14.783 147.041,14.984 146.924,14.984
  pour cut-out: 146.369,18.944 146.385,18.96 146.385,19.131 146.39,19.126 146.583,19.126 146.583,18.923 146.563,18.944
  pour cut-out: 93.715,99.303 93.715,89.637 101.414,89.637 101.414,99.339 93.715,99.339
  pour cut-out: 25.73,17.094 25.932,17.296 25.932,25.265 16.868,25.265 16.764,25.161 16.764,17.12 16.789,17.094
  pour cut-out: 25.273,33.196 25.932,33.196 25.959,33.223 25.959,33.579 25.857,33.579 25.273,34.163
  pour cut-out: 17.043,29.464 17.043,29.658 17.636,30.251 17.806,30.081 17.806,29.871 17.369,29.434 17.339,29.464
  pour cut-out: 19.309,51.405 19.309,51.735 19.304,51.74 19.482,51.74 19.482,51.46 19.507,51.435 19.477,51.405
  pour cut-out: 15.337,62.873 15.337,62.006 15.342,62.001 15.596,62.001 15.596,63.068 15.57,63.094 15.349,62.873
  pour cut-out: 9.777,63.896 9.777,64.31 9.865,64.397 10.003,64.397 10.003,64.139 9.754,63.89 9.754,63.851
  pour cut-out: 14.341,66.36 15.035,66.36 15.035,66.051 14.498,66.051 14.341,66.209
  pour cut-out: 56.342,95.809 56.342,93.32 56.688,93.32 56.688,95.809
  pour cut-out: 55.977,97.922 55.977,97.617 55.982,97.612 55.829,97.612 55.829,97.774
  pour cut-out: 54.153,91.034 54.153,91.209 53.846,91.209 53.823,91.186 53.975,91.034
  pour cut-out: 47.295,89.914 48.371,89.914 48.385,89.9 48.412,89.927 48.412,90.195 47.346,90.195 47.295,90.246
  pour cut-out: 95.687,105.132 95.687,104.186 95.682,104.191 95.326,104.191 95.326,104.662 95.272,104.717 95.687,105.132
  pour cut-out: 77.906,59.182 77.905,59.183 77.905,59.768 78.222,59.768 78.323,59.668 78.167,59.513 78.167,59.202 77.992,59.202
  pour cut-out: 79.248,55.499 79.324,55.575 79.324,56.413 79.426,56.413 79.502,56.49 79.502,55.499
  pour cut-out: 94.676,32.048 94.667,32.057 94.204,32.057 94.204,32.009 94.231,31.982 94.609,31.982
Bottom Layer:
  pour cut-out: 91.796,37.433 ccw(c95.296,37.433) 95.296,33.933 ccw(c95.296,37.433) 98.796,37.433 ccw(c95.296,37.433) 95.296,40.933 ccw(c95.296,37.433)
  pour cut-out: 94.076,23.838 ccw(c97.576,23.838) 97.576,20.338 ccw(c97.576,23.838) 101.076,23.838 ccw(c97.576,23.838) 97.576,27.338 ccw(c97.576,23.838)
  pour cut-out: 47.219,37.433 ccw(c50.719,37.433) 50.719,33.933 ccw(c50.719,37.433) 54.219,37.433 ccw(c50.719,37.433) 50.719,40.933 ccw(c50.719,37.433)
  pour cut-out: 45.446,23.778 ccw(c48.946,23.778) 48.946,20.278 ccw(c48.946,23.778) 52.446,23.778 ccw(c48.946,23.778) 48.946,27.278 ccw(c48.946,23.778)
  pour cut-out: 1.58,3.55 ccw(c5.08,3.55) 5.08,0.05 ccw(c5.08,3.55) 8.58,3.55 ccw(c5.08,3.55) 5.08,7.05 ccw(c5.08,3.55)
  pour cut-out: 13.593,12.898 ccw(c17.093,12.898) 17.093,9.398 ccw(c17.093,12.898) 20.593,12.898 ccw(c17.093,12.898) 17.093,16.398 ccw(c17.093,12.898)
  pour cut-out: 42.131,2.362 ccw(c45.631,2.362) 45.631,-1.138 ccw(c45.631,2.362) 49.131,2.362 ccw(c45.631,2.362) 45.631,5.862 ccw(c45.631,2.362)
  pour cut-out: 97.181,2.362 ccw(c100.681,2.362) 100.681,-1.138 ccw(c100.681,2.362) 104.181,2.362 ccw(c100.681,2.362) 100.681,5.862 ccw(c100.681,2.362)
  pour cut-out: 154.336,3.55 ccw(c157.836,3.55) 157.836,0.05 ccw(c157.836,3.55) 161.336,3.55 ccw(c157.836,3.55) 157.836,7.05 ccw(c157.836,3.55)
  pour cut-out: 143.006,23.693 ccw(c146.506,23.693) 146.506,20.193 ccw(c146.506,23.693) 150.006,23.693 ccw(c146.506,23.693) 146.506,27.193 ccw(c146.506,23.693)
  pour cut-out: 131.068,90.241 ccw(c134.568,90.241) 134.568,86.741 ccw(c134.568,90.241) 138.068,90.241 ccw(c134.568,90.241) 134.568,93.741 ccw(c134.568,90.241)
  pour cut-out: 154.336,117.399 ccw(c157.836,117.399) 157.836,113.899 ccw(c157.836,117.399) 161.336,117.399 ccw(c157.836,117.399) 157.836,120.899 ccw(c157.836,117.399)
  pour cut-out: 10.418,107.132 ccw(c13.918,107.132) 13.918,103.632 ccw(c13.918,107.132) 17.418,107.132 ccw(c13.918,107.132) 13.918,110.632 ccw(c13.918,107.132)
  pour cut-out: 1.58,117.399 ccw(c5.08,117.399) 5.08,113.899 ccw(c5.08,117.399) 8.58,117.399 ccw(c5.08,117.399) 5.08,120.899 ccw(c5.08,117.399)
  pour cut-out: 127.381,111.354 141.529,111.354 143.18,109.703 143.18,102.311 139.649,98.781 127.381,98.781 127.229,98.933
  pour cut-out: 43.357,80.65 43.506,80.501 43.506,80.29 43.357,80.29 43.221,80.426 43.357,80.563
  pour cut-out: 81.99,105.462 82.034,105.418 82.663,105.418 82.663,105.792 82.32,105.792
  pour cut-out: 111.818,58.568 111.941,58.69 111.941,59.24 111.793,59.24 111.689,59.135 111.689,58.611 111.775,58.611
  pour cut-out: 106.375,62.029 106.401,62.054 106.401,62.332 106.502,62.332 106.705,62.129 106.705,61.921 106.482,61.921
  pour cut-out: 127.3,61.755 127.3,62.552 127.336,62.552 127.409,62.626 127.508,62.527 127.508,61.595 127.46,61.595
  pour cut-out: 24.939,89.282 25.407,88.814 25.522,88.814 25.659,88.95 25.171,89.438 25.019,89.438 25.019,89.361
  pour cut-out: 22.555,89.958 21.909,89.958 21.909,89.738 21.959,89.788 22.385,89.788
  pour cut-out: 27.818,31.558 27.576,31.8 27.556,31.8 27.68,31.924 27.804,31.8 27.918,31.8 27.918,31.578 27.811,31.471
  pour cut-out: 37.641,35.778 37.641,36.249 37.834,36.249 37.904,36.319 37.904,35.708 37.712,35.708
  pour cut-out: 71.371,112.29 71.489,112.29 71.601,112.178 71.432,112.009 71.432,112.229
  pour cut-out: 78.794,112.584 79.223,113.013 81.264,113.013 81.427,112.85 81.073,112.495 78.873,112.495 78.873,112.506
  pour cut-out: 71.409,114.718 72.199,114.718 72.199,114.389 72.176,114.366 71.432,114.366 71.432,114.695
  pour cut-out: 37.515,89.437 37.516,89.436 37.516,89.002 37.363,89.002 37.273,89.092 37.273,89.337 37.415,89.337
  pour cut-out: 89.381,73.254 89.052,73.583 89.052,73.588 89.176,73.712 89.407,73.48 89.431,73.48 89.431,73.303
  pour cut-out: 16.509,45.427 17.072,45.427 17.072,45.254 16.877,45.059

## Silkscreen, mask and mechanical layers (free items; w line width, h text height)
Top Overlay:
  drawing of 1562 lines, arcs and shapes, not listed
  text "PD14" at 52.883,120.066 h0.65
  text "PD15" at 55.423,120.066 h0.65
  text "PD0" at 58.217,120.066 h0.65
  text "PD1" at 61.011,120.066 h0.65
  text "PE7" at 63.297,120.066 h0.65
  text "PE8" at 65.964,120.066 h0.65
  text "PE9" at 68.377,120.066 h0.65
  text "PE10" at 70.663,120.066 h0.65
  text "PE11" at 73.33,120.066 h0.65
  text "PE12" at 75.743,120.066 h0.65
  text "PE13" at 78.41,120.066 h0.65
  text "PE14" at 80.95,120.066 h0.65
  text "PE15" at 83.49,120.066 h0.65
  text "PD8" at 86.284,120.066 h0.65
  text "PD9" at 88.697,120.066 h0.65
  text "PD10" at 91.11,120.066 h0.65
  text "A" at 152.197,111.43 h0.89
  text "CANL" at 9.957,111.303 h0.89
  text "CANH" at 14.91,111.303 h0.89
  text "B" at 144.704,111.303 h0.89
  text "PB14" at 39.167,82.601 h0.89
  text "GND" at 30.785,82.474 h0.89
  text "I2S2" at 98.222,82.474 h1.78
  text "PB12" at 104.318,82.474 h0.89
  text "GND" at 113.081,82.474 h0.89
  text "PB12/PB13" at 95.174,80.569 h1.09
  text "PB15" at 30.277,79.934 h0.89
  text "PD11" at 39.167,79.934 h0.89
  text "PG1" at 105.207,79.934 h0.89
  text "PB13" at 113.081,79.934 h0.89
  text "GND" at 150.673,78.562 h0.89
  text "PD12" at 30.277,77.394 h0.89
  text "PD13" at 39.167,77.394 h0.89
  text "PF15" at 104.445,77.394 h0.89
  text "PG0" at 113.081,77.394 h0.89
  text "5V" at 151.003,75.743 h0.89
  text "PG2" at 30.912,74.854 h0.89
  text "PG3" at 39.167,74.854 h0.89
  text "PF13" at 104.445,74.854 h0.89
  text "PF14" at 113.081,74.854 h0.89
  text "CAN_RX" at 13.589,73.406 h0.89
  text "CAN_TX" at 24.181,73.203 h0.89
  text "COM2_RX" at 117.018,73.203 h0.89
  text "COM2_TX" at 128.448,73.203 h0.89
  text "PG4" at 30.912,72.314 h0.89
  text "PG5" at 39.167,72.314 h0.89
  text "PF11" at 104.699,72.314 h0.89
  text "PF12" at 113.081,72.314 h0.89
  text "GND" at 150.571,71.044 h0.89
  text "PA11" at 15.799,70.536 h0.89
  text "PA2(TX)" at 117.907,70.536 h0.89
  text "PA3(RX)" at 128.448,70.536 h0.89
  text "PA12" at 24.232,70.434 h0.89
  text "PG6" at 30.912,69.774 h0.89
  text "PG7" at 39.167,69.774 h0.89
  text "PB1" at 105.207,69.774 h0.89
  text "PB2" at 113.081,69.774 h0.89
  text "I2S2" at 43.104,69.52 h1.78
  text "3.3V" at 150.241,68.453 h0.89
  text "D-" at 16.815,67.996 h0.89
  text "D+" at 24.181,67.996 h0.89
  text "485_RX" at 118.034,67.996 h0.89
  text "485_TX" at 128.448,67.996 h0.89
  text "PC6" at 43.104,67.742 h1.09
  text "PG8" at 30.912,67.234 h0.89
  text "PC6" at 39.167,67.234 h0.89
  text "PC5" at 104.826,67.234 h0.89
  text "PB0" at 113.081,67.234 h0.89
  text "LED" at 158.547,64.821 h1.02
  text "PC8" at 39.167,64.694 h0.89
  text "PA7" at 104.826,64.694 h0.89
  text "PC4" at 113.081,64.694 h0.89
  text "PC7" at 31.013,64.567 h0.89
  text "COM3_TX" at 117.018,62.916 h0.89
  text "COM3_RX" at 128.448,62.916 h0.89
  text "KEY" at 158.547,62.255 h1.02
  text "PA5" at 104.75,62.205 h0.89
  text "PA8" at 39.167,62.154 h0.89
  text "PA6" at 113.081,62.154 h0.89
  text "PC9" at 30.988,62.001 h0.89
  text "PA9(T)" at 14.275,60.376 h0.89
  text "PA10(R)" at 24.308,60.376 h0.89
  text "SDIO" at 43.104,60.376 h1.78
  text "PB11(RX)" at 117.399,60.376 h0.89
  text "PB10(TX)" at 128.448,60.376 h0.89
  text "PA0" at 104.724,59.893 h0.89
  text "RXD" at 158.42,59.741 h1.02
  text "PA13" at 30.277,59.614 h0.89
  text "PA14" at 39.167,59.614 h0.89
  text "PA4" at 113.081,59.614 h0.89
  text "PC8/PC9/PC10" at 43.104,58.217 h1.09
  text "RXD" at 16.053,57.836 h0.89
  text "TXD" at 24.308,57.836 h0.89
  text "GBC_TX" at 118.034,57.836 h0.89
  text "GBC_RX" at 128.448,57.836 h0.89
  text "TXD" at 158.42,57.201 h1.02
  text "PA15" at 30.277,57.074 h0.89
  text "PC10" at 39.167,57.074 h0.89
  text "PC3" at 104.826,57.074 h0.89
  text "PA1" at 113.081,57.074 h0.89
  text "PC11/PC12/PD2" at 43.104,56.185 h1.09
  text "GND" at 158.42,54.661 h1.02
  text "I2S2" at 97.917,54.559 h1.78
  text "PC11" at 30.531,54.534 h0.89
  text "PC12" at 39.167,54.534 h0.89
  text "PC1" at 105.207,54.534 h0.89
  text "PC2" at 113.081,54.534 h0.89
  text "PC2/PC3" at 96.749,52.883 h1.09
  text "5V" at 158.42,52.121 h1.02
  text "PD2" at 30.912,51.994 h0.89
  text "PD3" at 39.167,51.994 h0.89
  text "PF10" at 104.445,51.994 h0.89
  text "PC0" at 113.081,51.994 h0.89
  text "PD4" at 30.912,49.581 h0.89
  text "PD5" at 39.167,49.454 h0.89
  text "PF8" at 105.08,49.454 h0.89
  text "PF9" at 113.081,49.454 h0.89
  text "PD6" at 30.912,46.914 h0.89
  text "PD7" at 39.167,46.914 h0.89
  text "PF6" at 105.08,46.914 h0.89
  text "PF7" at 113.081,46.914 h0.89
  text "PG9" at 30.912,44.374 h0.89
  text "PG10" at 39.167,44.374 h0.89
  text "PF4" at 105.08,44.374 h0.89
  text "PF5" at 113.081,44.374 h0.89
  text "PF3" at 113.106,41.91 h0.89
  text "PG11" at 30.658,41.834 h0.89
  text "PG12" at 39.167,41.834 h0.89
  text "PF2" at 105.08,41.834 h0.89
  text "PG13" at 30.277,39.294 h0.89
  text "PG14" at 39.167,39.294 h0.89
  text "PF0" at 105.08,39.294 h0.89
  text "PF1" at 113.081,39.294 h0.89
  text "PG15" at 30.378,36.754 h0.89
  text "PB3" at 39.167,36.754 h0.89
  text "PE6" at 104.953,36.754 h0.89
  text "PC13" at 113.081,36.754 h0.89
  text "SPI1" at 42.977,35.865 h1.78
  text "PE5" at 113.081,34.468 h0.89
  text "PB4" at 30.912,34.214 h0.89
  text "PB5" at 39.167,34.214 h0.89
  text "PE4" at 104.953,34.214 h0.89
  text "PB3/PB4/PB5" at 42.901,33.198 h1.14
  text "PB6" at 30.912,31.674 h0.89
  text "PB7" at 39.167,31.674 h0.89
  text "PE2" at 104.953,31.674 h0.89
  text "PE3" at 113.081,31.674 h0.89
  text "I2C1" at 42.977,30.15 h1.78
  text "PB8" at 30.912,29.134 h0.89
  text "PB9" at 39.167,29.134 h0.89
  text "PE0" at 104.953,29.134 h0.89
  text "PE1" at 113.081,29.134 h0.89
  text "PB8/PB9" at 42.977,28.372 h1.14
  text "Vref+" at 120.752,25.044 h0.89
  text "VDDA" at 124.511,24.943 h0.89
  text "RV1" at 158.109,20.955 h0.89
  text "DAC" at 158.109,18.542 h0.89
  text "3.3V" at 107.366,18.466 h0.89
  text "B1" at 110.541,18.466 h0.89
  text "GND" at 112.573,18.466 h0.89
  text "AIN" at 150.673,18.466 h0.89
  text "PDC" at 150.165,15.926 h0.89
  text "ADC" at 158.109,15.875 h0.89
  text "TPAD" at 158.109,13.335 h0.89
  text "3.3V" at 107.366,11.735 h0.89
  text "B0" at 110.541,11.735 h0.89
  text "GND" at 112.573,11.735 h0.89
  text "OLED/CAMERA" at 12.446,8.306 h1.65
  text "GND" at 9.703,6.909 h0.89
  text "SCL" at 12.37,6.909 h0.89
  text "SDA" at 14.91,6.909 h0.89
  text "D0" at 17.831,6.909 h0.89
  text "D2" at 20.244,6.909 h0.89
  text "D4" at 22.784,6.909 h0.89
  text "D6" at 25.451,6.909 h0.89
  text "PCLK" at 27.229,6.909 h0.89
  text "PWDN" at 30.404,6.909 h0.89
  text "LSENSOR" at 34.087,6.452 h1.22
  text "3.3V" at 8.306,0.305 h0.89
  text "VSYNC" at 11.227,0.305 h0.89
  text "HREF" at 15.545,0.305 h0.89
  text "RST" at 18.847,0.305 h0.89
  text "D1" at 21.387,0.305 h0.89
  text "D3" at 22.911,0.305 h0.89
  text "D5" at 25.451,0.305 h0.89
  text "D7" at 28.118,0.305 h0.89
  text "XCLK" at 30.023,0.305 h0.89
Bottom Overlay:
  drawing of 8475 lines, arcs and shapes, not listed
  text "D0" at 54.661,119.685 h0.89
  text "D1" at 57.074,119.685 h0.89
  text "D2" at 59.741,119.685 h0.89
  text "D3" at 62.281,119.685 h0.89
  text "D4" at 64.821,119.685 h0.89
  text "D5" at 67.361,119.685 h0.89
  text "D6" at 69.901,119.685 h0.89
  text "D7" at 72.441,119.685 h0.89
  text "D8" at 74.981,119.685 h0.89
  text "D9" at 77.521,119.685 h0.89
  text "D10" at 80.442,119.685 h0.89
  text "D11" at 82.728,119.685 h0.89
  text "D12" at 85.522,119.685 h0.89
  text "D13" at 88.062,119.685 h0.89
  text "D14" at 90.602,119.685 h0.89
  text "D15" at 93.142,119.685 h0.89
  text "D13" at 76.352,109.703 h0.71
  text "www.openedv.com/forum.php" at 101.371,80.823 h2.54
  text "GND" at 152.705,78.156 h0.89
  text "www.alientek.com" at 89.84,76.505 h2.54
  text "5V" at 152.502,75.717 h0.89
  text "GND" at 5.766,73.584 h0.89
  text "CAN_TX" at 29.108,73.101 h0.89
  text "CAN_RX" at 18.466,73.076 h0.89
  text "COM2_RX" at 122.606,73.076 h0.89
  text "COM2_TX" at 134.29,73.076 h0.89
  text "www.yuanzige.com" at 90.348,72.568 h2.54
  text "GND" at 152.578,71.044 h0.89
  text "PA11" at 18.466,70.536 h0.89
  text "PA12" at 27.229,70.536 h0.89
  text "PA2(RX)" at 133.909,70.536 h0.89
  text "PA2(TX)" at 122.606,70.409 h0.89
  text "3.3V" at 152.832,68.504 h0.89
  text "D-" at 18.466,67.996 h0.89
  text "D+" at 25.578,67.996 h0.89
  text "485_RX" at 122.733,67.869 h0.89
  text "485_TX" at 133.528,67.869 h0.89
  text "ATK-DNF407 V3.4" at 86.893,67.818 h2
  text "LED" at 160.884,64.872 h0.89
  text "COM3_TX" at 122.733,62.789 h0.89
  text "COM3_RX" at 134.29,62.789 h0.89
  text "KEY" at 160.706,62.281 h0.89
  text "PA9(T)" at 18.466,60.376 h0.89
  text "PA10(R)" at 29.388,60.376 h0.89
  text "PB11(RX)" at 122.733,60.376 h0.89
  text "PB10(TX)" at 134.544,60.249 h0.89
  text "RXD" at 160.706,59.741 h0.89
  text "SWDCLK" at 13.894,59.106 h0.89
  text "RXD" at 18.466,57.836 h0.89
  text "TXD" at 26.467,57.836 h0.89
  text "GBC_TX" at 122.733,57.709 h0.89
  text "GBC_RX" at 133.401,57.709 h0.89
  text "TXD" at 160.706,57.201 h0.89
  text "SWDIO" at 12.878,56.566 h0.89
  text "GND" at 160.706,54.661 h0.89
  text "5V" at 159.944,52.121 h0.89
  text "3.3V" at 11.481,48.946 h0.89
  text "SPEAKER" at 78.334,47.066 h1.52
  text "Vref+" at 123.596,25.095 h0.89
  text "VDDA" at 127.737,25.095 h0.89
  text "RV1" at 160.325,21.006 h0.89
  text "DAC" at 160.325,18.593 h0.89
  text "AIN" at 152.451,18.466 h0.89
  text "PDC" at 152.451,15.926 h0.89
  text "ADC" at 160.325,15.926 h0.89
  text "TPAD" at 161.087,13.386 h0.89
Top Solder:
  drawing of 5903 lines, arcs and shapes, not listed
  text "WIRELESS" at 8.103,112.116 h1.27 r270
  text "DC6-15V" at 153.213,110.287 h1.27
  text "ON/OFF" at 153.34,99.238 h1.27
  text "USART2" at 122.098,65.456 h1.27
  text "USB/CAN" at 17.094,65.151 h1.27
  text "USART1" at 18.085,55.118 h1.27
  text "USART3" at 122.072,54.966 h1.27
  text "ATK MODULE" at 154.864,51.74 h1.52 r90
Mechanical 1:
  lines w0.203: 158.908,-0.051 ccw(c158.908,2.489) 161.448,2.489 161.448,118.415 ccw(c158.908,118.415) 158.908,120.955 3.988,120.955 ccw(c3.988,118.415) 1.448,118.415 1.448,2.495 ccw(c3.988,2.495) 3.988,-0.045 158.908,-0.045

## Dimensions
3.988,120.955 to 3.988,-0.045 on Top Overlay
1.448,118.415 to 161.448,118.415 on Top Overlay